# Allegro board 20250806_UNOQ.brd
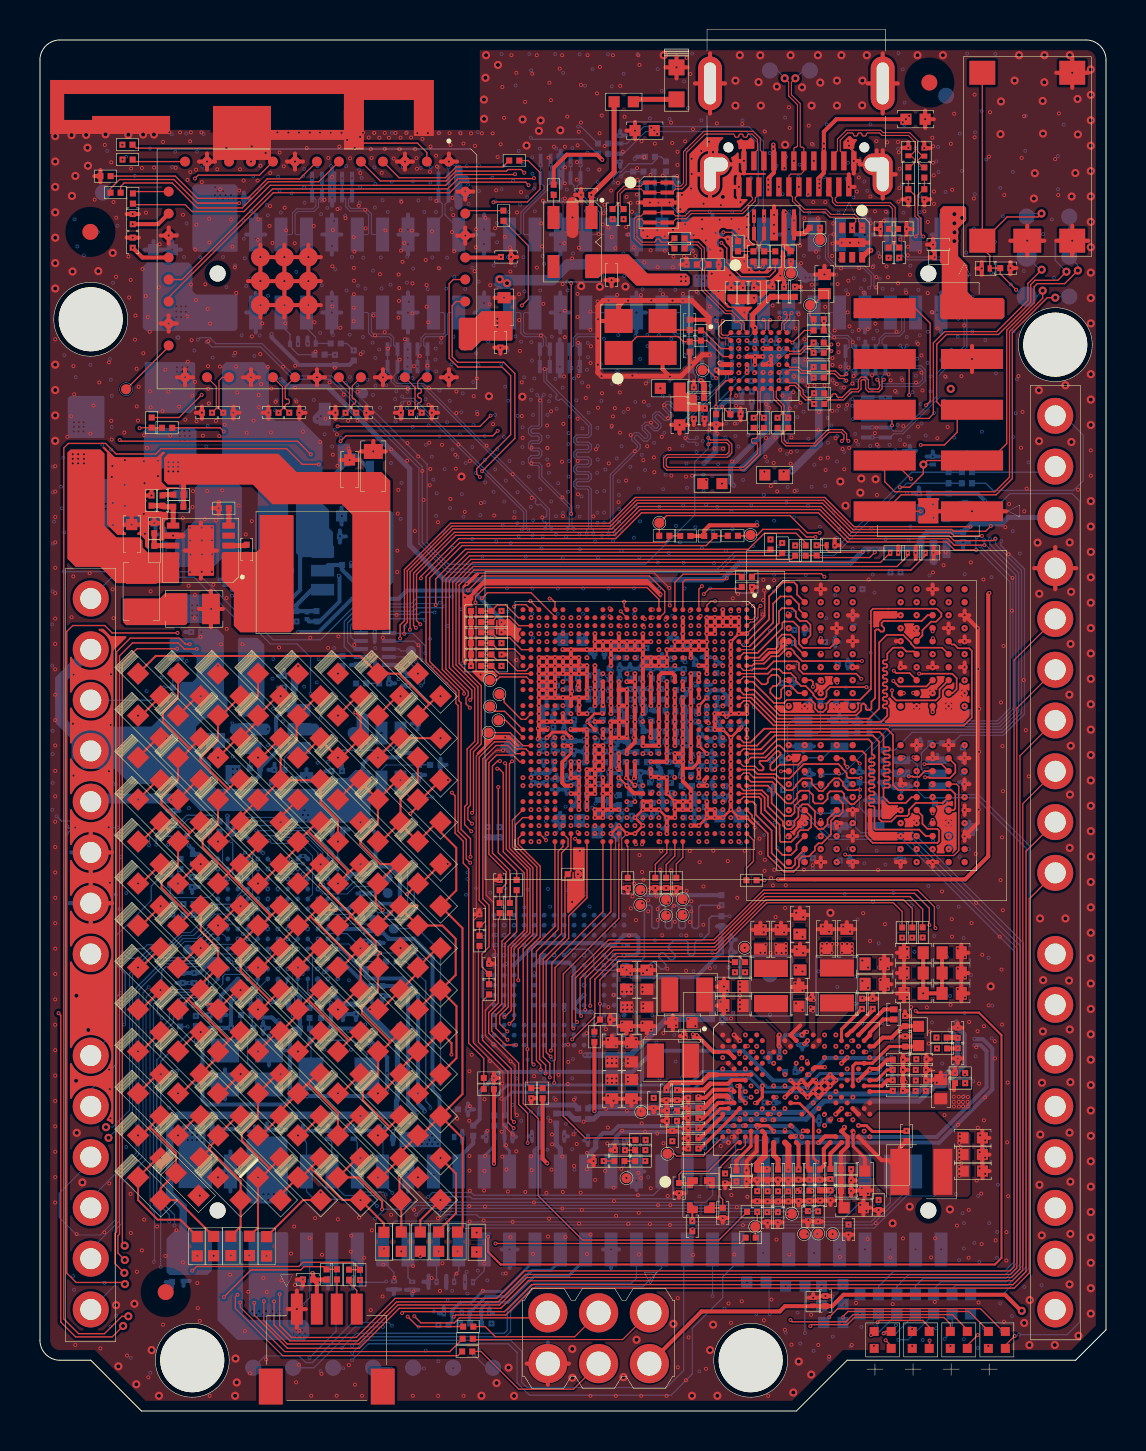
[diagram p0: board, top side]
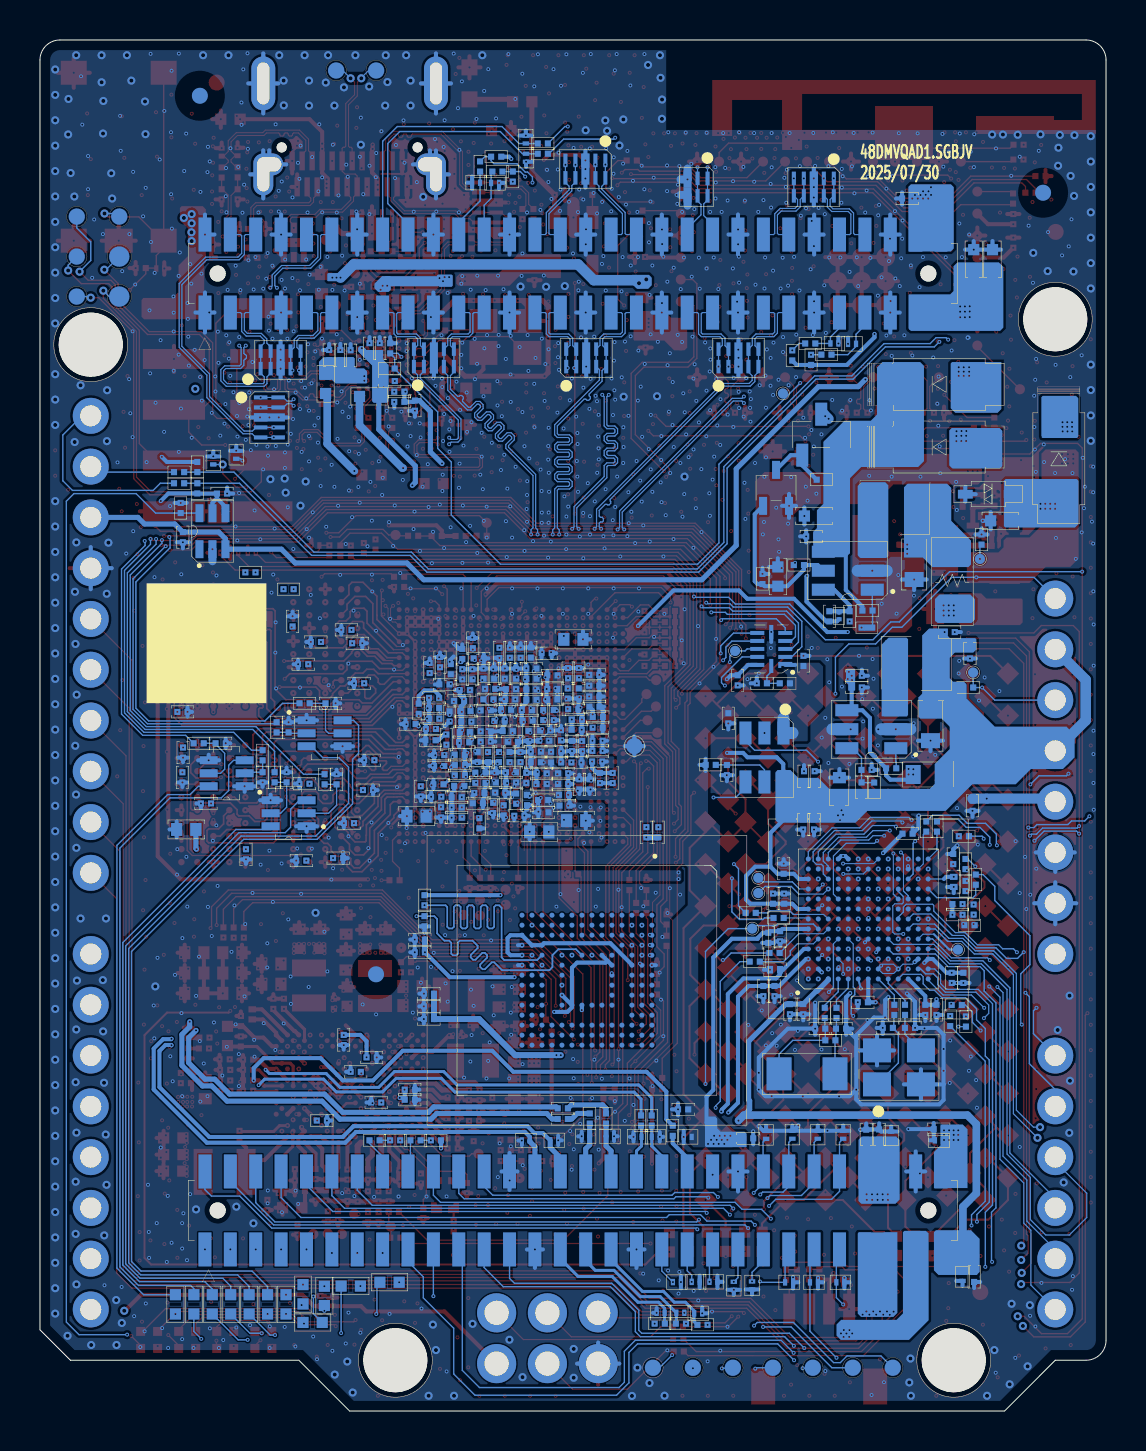
[diagram p1: board, bottom side, seen from below]

Outline 53.34 x 68.58 mm; copper layers: TOP, G2, S3, V4, V5, S6, G7, BOTTOM. Coordinates in mm from the lower left corner of the outline.
Outline path: 0,67.58 0,3.54 arc(0.29,2.83) 1,2.54 2.54,2.54 5.08,0 37.85,0 40.39,2.54 51.82,2.54 53.34,4.06 53.34,67.58 arc(53.05,68.29) 52.34,68.58 1,68.58 arc(0.29,68.29) 0,67.58

## Design rules (mm)
constraint set DEFAULT: min track width 0.066
net group DP_MUX_SSRXN1_C: nets MUX_SSRXN1_C MUX_SSRXP1_C
net group DP_MUX_SSRXN2_C: nets MUX_SSRXN2_C MUX_SSRXP2_C
net group EAR_M_R: nets EAR_M_R EAR_P_R
net group EBI0_CKE: nets EBI0_CKE_0 EBI0_CKE_1
net group EBI0_CLK: nets EBI0_CLK_M EBI0_CLK_P
net group EBI0_DQS_0: nets EBI0_DQS_0_M EBI0_DQS_0_P
net group EBI0_DQS_1: nets EBI0_DQS_1_M EBI0_DQS_1_P
net group EBI1_CKE: nets EBI1_CKE_0 EBI1_CKE_1
net group EBI1_CLK: nets EBI1_CLK_M EBI1_CLK_P
net group EBI1_DQS_0: nets EBI1_DQS_0_M EBI1_DQS_0_P
net group EBI1_DQS_1: nets EBI1_DQS_1_M EBI1_DQS_1_P
net group LINEOUT: nets LINEOUT_M LINEOUT_P
net group LINEOUT_CONN: nets LINEOUT_M_CONN LINEOUT_P_CONN
net group LINEOUT_P_C: nets LINEOUT_M_C LINEOUT_P_C
net group MG_CMD: nets WL_CMD_CLK WL_CMD_DATA
net group MIPI_DSI0_CLK_M: nets MIPI_DSI0_CLK_M MIPI_DSI0_CLK_M_CONN
net group MIPI_DSI0_CLK_P: nets MIPI_DSI0_CLK_P MIPI_DSI0_CLK_P_CONN
net group MIPI_DSI0_L0_M: nets MIPI_DSI0_L0_M MIPI_DSI0_L0_M_CONN
net group MIPI_DSI0_L0_P: nets MIPI_DSI0_L0_P MIPI_DSI0_L0_P_CONN
net group MIPI_DSI0_L1_M: nets MIPI_DSI0_L1_M MIPI_DSI0_L1_M_CONN
net group MIPI_DSI0_L1_P: nets MIPI_DSI0_L1_P MIPI_DSI0_L1_P_CONN
net group MIPI_DSI0_L3_M: nets MIPI_DSI0_L3_M MIPI_DSI0_L3_M_CONN
net group MIPI_DSI0_L3_P: nets MIPI_DSI0_L3_P MIPI_DSI0_L3_P_CONN
net group MUX_SBU1: nets MUX_SBU1 SBU1_AUXP
net group MUX_SBU2: nets MUX_SBU2 SBU2_AUXN
net group MUX_SSRXN2: nets MUX_SSRXN2 MUX_SSRXP2
net group MUX_SSRXP1: nets MUX_SSRXN1 MUX_SSRXP1
net group MUX_SSTXN1_C: nets MUX_SSTXN1 MUX_SSTXP1
net group MUX_SSTXN2: nets MUX_SSTXN2 MUX_SSTXP2
net group MUX_SSTXN2_C: nets MUX_SSTXN2_C MUX_SSTXP2_C
net group MUX_SSTXP1_C: nets MUX_SSTXN1_C MUX_SSTXP1_C
net group SDC1_CLK: nets SDC1_CLK SDC1_CLK_TR
net group VFB_S3: nets VFB_NEG_S3 VFB_S3
net group VFB_S4: nets VFB_NEG_S4 VFB_S4
net group VSNS_S1A_APC: nets VSNS_S1A_APC_M VSNS_S1A_APC_P
net group VSNS_S2A_CX: nets VSNS_S2A_CX_M VSNS_S2A_CX_P
net group CLS_CRITICAL: nets SOC_I2S_D0_R SOC_I2S_SCK SOC_I2S_SCK_R SOC_I2S_WS SOC_I2S_WS_R SOC_UART_RX_SE4 SOC_UART_TX_SE4
net group CLS_LED_MATRIX: nets LED_MATRIX_0 LED_MATRIX_0_R LED_MATRIX_1 LED_MATRIX_1_R LED_MATRIX_2 LED_MATRIX_2_R LED_MATRIX_3 LED_MATRIX_3_R LED_MATRIX_4 LED_MATRIX_4_R LED_MATRIX_5 LED_MATRIX_5_R LED_MATRIX_6 LED_MATRIX_6_R LED_MATRIX_7 LED_MATRIX_7_R LED_MATRIX_8 LED_MATRIX_8_R LED_MATRIX_9 LED_MATRIX_9_R LED_MATRIX_10 LED_MATRIX_10_R LED_MATRIX_11
net group CLS_POWER: nets AVDD1P0V AVDD1P8V AVDD3P0V DVDD1P0V DVDD1P8V VBUS_DIV8 VCOIN VCONN_IN VREF_LPDDR3 VREF_MSM_1P25V VREF_TXDAC_1P25V VREG_L3A_0P6V VREG_L4A_2P96V VREG_L5A_1P232V VREG_L6A_0P9V VREG_L7A_0P664V VREG_L8A_1P0V VREG_L9A_1P0V VREG_L10A_1P3V VREG_L11A_1P0V VREG_L12A_0P9V VREG_L13A_1P8V VREG_L14A_1P8V VREG_L16A_1P8V VREG_L17A_3P0V VREG_L18A_1P8V VREG_L19A_1P8V VREG_L21A_2P96V VREG_L22A_3P3V VREG_S1A_0P8V VREG_XO VSW_S1 VSW_S2 VSW_S3 VSW_S4
net group CLS_SINGEL-50R: nets ANT_CH0 FM_ANT LNBBCLK1 LNBBCLK2 LNBBCLK2_R MUX_XTAL_IN MUX_XTAL_OUT RFCLK2 RTC_SLEEP_CLK RTC_SLEEP_CLK_R SLEEP_CLK SM_LNBBCLK1 SWR_RX_CLK SWR_RX_CLK_R SWR_RX_DATA0 SWR_RX_DATA0_R SWR_RX_DATA1 SWR_RX_DATA1_R SWR_TX_CLK SWR_TX_CLK_R SWR_TX_DATA0 SWR_TX_DATA0_R WCN_RFCLK2 WCN_RFCLK2_R WLAN_XO_CLK
net group EBI0_CA_CS: nets EBI0_CA_0 EBI0_CA_1 EBI0_CA_2 EBI0_CA_3 EBI0_CA_4 EBI0_CA_5 EBI0_CS_0 EBI0_CS_1
net group EBI0_DQ0-7: nets EBI0_DMI_0 EBI0_DQ0 EBI0_DQ1 EBI0_DQ2 EBI0_DQ3 EBI0_DQ4 EBI0_DQ5 EBI0_DQ6 EBI0_DQ7
net group EBI0_DQ8_15: nets EBI0_DMI_1 EBI0_DQ8 EBI0_DQ9 EBI0_DQ10 EBI0_DQ11 EBI0_DQ12 EBI0_DQ13 EBI0_DQ14 EBI0_DQ15
net group EBI1_CA_CS: nets EBI1_CA_0 EBI1_CA_1 EBI1_CA_2 EBI1_CA_3 EBI1_CA_4 EBI1_CA_5 EBI1_CS_0 EBI1_CS_1
net group EBI1_DQ0_7: nets EBI1_DMI_0 EBI1_DQ0 EBI1_DQ1 EBI1_DQ2 EBI1_DQ3 EBI1_DQ4 EBI1_DQ5 EBI1_DQ6 EBI1_DQ7
net group EBI1_DQ8_15: nets EBI1_DMI_1 EBI1_DQ8 EBI1_DQ9 EBI1_DQ10 EBI1_DQ11 EBI1_DQ12 EBI1_DQ13 EBI1_DQ14 EBI1_DQ15
net group MIPI_DSI0_L2_M: nets MIPI_DSI0_L2_M
net group MIPI_DSI0_L2_P: nets MIPI_DSI0_L2_P
net group SDC1: nets SDC1_CMD SDC1_DATA_0 SDC1_DATA_1 SDC1_DATA_2 SDC1_DATA_3 SDC1_DATA_4 SDC1_DATA_5 SDC1_DATA_6 SDC1_DATA_7 SDC1_RCLK

## Placement (name value [footprint] x y rotation side)
ANT1  CLIP2P  [ANT2_1920X400]  15.71 64.83 0 top
C501  2.2UF/6.3V  [C0201_H04_T30]  42.72 19.84 0 top
C502  1UF/6.3V  [C0201_H040]  43.29 19.51 180 top
C503  1UF/6.3V  [C0201_H040]  43.29 18.49 180 top
C504  1UF/6.3V  [C0201_H040]  41.13 20.37 180 top
C505  1UF/6.3V  [C0201_H040]  42.93 17.58 90 top
C506  1UF/6.3V  [C0201_H040]  41.66 20.37 180 top
C507  680PF/25V  [C0201_H030]  42.93 17.07 90 top
C508  470PF/50V  [C0201_H030]  42.93 16.54 90 top
C509  680PF/25V  [C0201_H030]  42.93 16.02 90 top
C510  33PF/50V  [C0201_H030]  44.08 17.06 90 top
C511  33PF/50V  [C0201_H030]  44.08 16.53 90 top
C512  100NF/6.3V  [C0201_H030]  44.1 17.59 90 top
C513  100NF/6.3V  [C0201_H030]  27.18 14.61 270 bottom
C514  100NF/6.3V  [C0201_H030]  27.18 15.14 270 bottom
C601  4.7UF/10V  [C0402_H060]  40.72 10.17 90 top
C602  1UF/10V  [C0201_H030]  40.34 11.53 90 top
C603  100NF/10V  [C0201_H030]  40.34 11.01 90 top
C604  10UF/10V  [C0402_H060]  46.68 12 90 top
C605  10UF/10V  [C0402_H060]  46.67 12.83 90 top
C606  10UF/10V  [C0402_H060]  46.67 13.66 90 top
C607  10UF/6.3V  [C0402_H07_T30]  45.07 16.1 180 top
C608  4.7UF/10V  [C0402_H060]  41.27 11.52 0 top
C609  27NF/16V  [C0201_H030]  43.36 13.76 0 top
C610  4.7UF/6.3V  [C0201_H060]  40.46 9.07 0 top
C701  7PF/25V  [C0201_H030]  31.98 11.15 0 top
C702  7PF/25V  [C0201_H030]  34.16 9.91 0 top
C703  1000PF/50V  [C0201_H030]  32.64 9.25 180 top
C704  1UF/6.3V  [C0201_H040]  34.28 11.63 0 top
C705  1UF/6.3V  [C0201_H040]  35.1 11.48 90 top
C706  4.7UF/6.3V  [C0201_H060]  35.1 12.04 90 top
C707  10PF/50V  [C0201_H030]  29.02 13.05 270 top
C708  10UF/6.3V  [C0402_H07_T30]  43.71 22.92 270 top
C709  10UF/6.3V  [C0402_H07_T30]  45.62 22.92 90 top
C710  10UF/6.3V  [C0402_H07_T30]  45.62 21.91 90 top
C711  10UF/6.3V  [C0402_H07_T30]  43.71 21.91 270 top
C712  10UF/6.3V  [C0402_H07_T30]  45.62 20.89 90 top
C713  10UF/6.3V  [C0402_H07_T30]  43.71 20.89 270 top
C714  1UF/6.3V  [C0201_H040]  31.62 15.02 270 top
C715  1UF/6.3V  [C0201_H040]  31.62 14.51 270 top
C716  100NF/10V  [C0201_H030]  31.64 13.75 180 top
C717  100NF/10V  [C0201_H030]  36.4 9.69 0 top
C718  100NF/6.3V  [C0201_H030]  38.5 10.77 0 top
C719  100NF/6.3V  [C0201_H030]  30.71 15.41 0 top
C720  0  [C0201_H030]  28.99 12.5 270 top
C721  22PF/50V  [C0201_H030]  27.95 12.5 270 top
C801  1UF/6.3V  [C0201_H040]  38.14 18.56 180 bottom
C802  1UF/6.3V  [C0201_H040]  36.75 17.69 90 bottom
C803  1UF/6.3V  [C0201_H040]  34.84 15.57 90 bottom
C804  1UF/6.3V  [C0201_H040]  34.84 16.07 90 bottom
C805  1UF/6.3V  [C0201_H040]  35.89 10.74 0 top
C806  10UF/6.3V  [C0402_H07_T30]  34.7 20.28 270 top
C807  10UF/6.3V  [C0402_H07_T30]  34.7 21.23 270 top
C808  10UF/6.3V  [C0402_H07_T30]  41.76 21.35 90 top
C809  10UF/6.3V  [C0402_H07_T30]  41.76 22.36 90 top
C810  10UF/6.3V  [C0402_H07_T30]  38.02 24.33 180 top
C811  10UF/6.3V  [C0402_H07_T30]  38.03 22.54 180 top
C812  1UF/6.3V  [C0201_H040]  37.96 11.83 0 top
C813  1UF/6.3V  [C0201_H040]  32.69 14.15 270 top
C814  1UF/6.3V  [C0201_H040]  32.69 13.64 270 top
C815  2.2UF/6.3V  [C0201_H030]  32.69 14.66 270 top
C816  2.2UF/6.3V  [C0201_H030]  31.88 15.8 0 top
C817  1UF/6.3V  [C0201_H040]  32.69 15.67 270 top
C818  4.7UF/6.3V  [C0201_H060]  31.34 15.8 0 top
C819  2.2UF/6.3V  [C0201_H030]  32.69 15.16 270 top
C820  2.2UF/6.3V  [C0201_H030]  32.69 13.13 270 top
C821  2.2UF/6.3V  [C0201_H030]  37.45 10.74 0 top
C822  4.7UF/6.3V  [C0201_H060]  37.45 11.83 0 top
C823  4.7UF/6.3V  [C0201_H060]  36.4 11.83 0 top
C824  1UF/6.3V  [C0201_H040]  35.89 11.83 0 top
C825  2.2UF/6.3V  [C0201_H030]  36.93 11.83 0 top
C826  4.7UF/6.3V  [C0201_H060]  38.51 11.83 0 top
C827  1UF/6.3V  [C0201_H040]  39.55 11.85 0 top
C828  1UF/6.3V  [C0201_H040]  39.02 11.83 0 top
C829  4.7UF/6.3V  [C0201_H060]  37.96 10.76 0 top
C830  4.7UF/6.3V  [C0201_H060]  36.93 10.74 0 top
C831  4.7UF/6.3V  [C0201_H060]  39.03 10.79 0 top
C832  1UF/6.3V  [C0201_H040]  39.55 10.79 0 top
C901  1UF/10V  [C0201_H030]  36.52 15.43 270 bottom
C902  1UF/10V  [C0201_H030]  37.54 16.97 270 bottom
C1001  1UF/10V  [C0201_H030]  38.63 20.37 180 top
C1002  10UF/10V  [C0402_H060]  37.97 20.73 180 top
C1003  10UF/10V  [C0402_H060]  32.15 19.43 270 top
C1004  1UF/10V  [C0201_H030]  32.5 18.76 270 top
C1005  10UF/6.3V  [C0402_H07_T30]  29.35 19.73 0 top
C1006  10UF/6.3V  [C0402_H07_T30]  29.35 21.57 180 top
C1007  10UF/6.3V  [C0402_H07_T30]  30.37 21.57 180 top
C1008  10UF/6.3V  [C0402_H07_T30]  30.37 19.73 0 top
C1009  10UF/6.3V  [C0402_H07_T30]  29.6 17.94 180 top
C1010  10UF/6.3V  [C0402_H07_T30]  28.61 16.1 0 top
C1011  10UF/6.3V  [C0402_H07_T30]  28.61 17.94 180 top
C1012  10UF/6.3V  [C0402_H07_T30]  29.6 16.1 0 top
C1101  100NF/6.3V  [C0201_H030]  15.14 37.52 0 bottom
C1102  100NF/6.3V  [C0201_H030]  18.43 36.55 180 bottom
C1103  100NF/6.3V  [C0201_H030]  18.9 34.65 180 bottom
C1104  100NF/6.3V  [C0201_H030]  14.58 31.75 0 bottom
C1105  4.7UF/6.3V  [C0201_H060]  17.22 36.4 270 bottom
C1106  4.7UF/6.3V  [C0201_H060]  18.97 32.06 180 bottom
C1201  100NF/6.3V  [C0201_H030]  23 26.31 180 top
C1202  33PF/50V  [C0201_H030]  21.99 24.59 180 top
C1203  33PF/50V  [C0201_H030]  22.47 22.12 180 top
C1601  2.7PF/50V  [C0201_H030]  19.35 49.94 90 top
C1602  2.7PF/50V  [C0201_H030]  18.31 49.94 270 top
C1603  2.7PF/50V  [C0201_H030]  9.42 49.94 90 top
C1604  2.7PF/50V  [C0201_H030]  8.36 49.94 270 top
C1701  1UF/6.3V  [C0201_H040]  30.38 32.71 180 bottom
C1702  100NF/6.3V  [C0201_H030]  24.68 31.66 180 bottom
C1703  100NF/6.3V  [C0201_H030]  25.32 31.66 180 bottom
C1704  100NF/6.3V  [C0201_H030]  26.66 35.11 90 bottom
C1705  10UF/6.3V  [C0402_H07_T30]  26.51 29.53 90 bottom
C1706  10UF/6.3V  [C0402_H07_T30]  39.34 23.62 180 top
C1707  10UF/6.3V  [C0402_H07_T30]  28.36 28.97 270 bottom
C1708  10UF/6.3V  [C0402_H07_T30]  40.37 23.62 180 top
C1709  100NF/6.3V  [C0201_H030]  27.51 32.44 90 bottom
C1710  100NF/6.3V  [C0201_H030]  28.53 32.45 270 bottom
C1711  2.2UF/6.3V  [C0201_H030]  29.77 31.95 270 bottom
C1712  2.2UF/6.3V  [C0201_H030]  29.85 32.71 0 bottom
C1713  100NF/6.3V  [C0201_H030]  28.24 31.9 270 bottom
C1714  470NF/6.3V  [C0201_H030]  27.12 30.82 90 bottom
C1715  470NF/6.3V  [C0201_H030]  28.24 31.36 270 bottom
C1716  470NF/6.3V  [C0201_H030]  29.29 32.71 0 bottom
C1717  100NF/6.3V  [C0201_H030]  27.51 32.98 90 bottom
C1718  100NF/6.3V  [C0201_H030]  28.97 30.56 180 bottom
C1719  100NF/6.3V  [C0201_H030]  28.53 32.98 270 bottom
C1720  100NF/6.3V  [C0201_H030]  27.16 31.36 90 bottom
C1721  100NF/6.3V  [C0201_H030]  27.09 30.28 90 bottom
C1722  2.2UF/6.3V  [C0201_H030]  28.11 33.53 270 bottom
C1723  2.2UF/6.3V  [C0201_H030]  28.15 29.95 270 bottom
C1724  100NF/6.3V  [C0201_H030]  27.16 31.9 90 bottom
C1725  100NF/6.3V  [C0201_H030]  28.16 30.56 270 bottom
C1727  4.7UF/6.3V  [C0201_H060]  32.33 31.8 90 bottom
C1728  2.2UF/6.3V  [C0201_H030]  28.78 37.94 0 bottom
C1729  100NF/6.3V  [C0201_H030]  31.04 35.04 90 bottom
C1730  100NF/6.3V  [C0201_H030]  31.04 34 90 bottom
C1731  100NF/6.3V  [C0201_H030]  32.34 32.82 90 bottom
C1732  470NF/6.3V  [C0201_H030]  28.75 36.09 270 bottom
C1733  10NF/10V  [C0201_H030]  32.37 35.52 90 bottom
C1734  1UF/6.3V  [C0201_H040]  28.75 35.58 270 bottom
C1735  1UF/6.3V  [C0201_H040]  28.94 34.54 270 bottom
C1736  2.2UF/6.3V  [C0201_H030]  31.04 33.49 90 bottom
C1737  2.2UF/6.3V  [C0201_H030]  31.14 36.89 0 bottom
C1738  470NF/6.3V  [C0201_H030]  32.85 34.74 180 bottom
C1739  100NF/6.3V  [C0201_H030]  30.81 36.12 90 bottom
C1740  100NF/6.3V  [C0201_H030]  28.75 37.14 270 bottom
C1741  100NF/6.3V  [C0201_H030]  28.75 36.63 270 bottom
C1742  1UF/6.3V  [C0201_H040]  31.44 32.72 180 bottom
C1743  1UF/6.3V  [C0201_H040]  26.5 32.44 90 bottom
C1801  10UF/6.3V  [C0402_H07_T30]  34.5 29.76 270 bottom
C1802  10UF/6.3V  [C0402_H07_T30]  26.65 38.6 90 bottom
C1803  10UF/6.3V  [C0402_H07_T30]  36.04 23.59 180 top
C1804  10UF/6.3V  [C0402_H07_T30]  37.08 23.59 180 top
C1805  1UF/6.3V  [C0201_H040]  27.7 36.8 270 bottom
C1806  1UF/6.3V  [C0201_H040]  27.7 36.12 270 bottom
C1807  2.2UF/6.3V  [C0201_H030]  27.63 34.81 180 bottom
C1808  100NF/6.3V  [C0201_H030]  29.81 35.6 270 bottom
C1809  100NF/6.3V  [C0201_H030]  29.94 34.01 270 bottom
C1810  100NF/6.3V  [C0201_H030]  32.08 36.06 270 bottom
C1811  100NF/6.3V  [C0201_H030]  32.08 33.96 270 bottom
C1812  100NF/6.3V  [C0201_H030]  30.9 35.6 270 bottom
C1813  100NF/6.3V  [C0201_H030]  27.71 35.6 270 bottom
C1814  1UF/6.3V  [C0201_H040]  30.02 35.08 270 bottom
C1815  1UF/6.3V  [C0201_H040]  32.12 33.46 270 bottom
C1816  1UF/6.3V  [C0201_H040]  30.34 34.53 90 bottom
C1817  1UF/6.3V  [C0201_H040]  31.3 31.93 90 bottom
C1818  4.7UF/6.3V  [C0201_H060]  30.61 36.89 0 bottom
C1819  470NF/6.3V  [C0201_H030]  29.78 36.11 270 bottom
C1820  2.2UF/6.3V  [C0201_H030]  29.52 36.88 0 bottom
C1821  100NF/6.3V  [C0201_H030]  32.05 35.01 270 bottom
C1822  1UF/6.3V  [C0201_H040]  30.08 36.89 0 bottom
C1823  1UF/6.3V  [C0201_H040]  29.68 33.48 90 bottom
C1824  4.7UF/6.3V  [C0201_H060]  28.06 34.04 90 bottom
C1825  100NF/6.3V  [C0201_H030]  28.89 33.77 180 bottom
C1826  2.2UF/6.3V  [C0201_H030]  26.21 33.27 180 bottom
C1827  100NF/6.3V  [C0201_H030]  26.72 33.27 180 bottom
C1828  100NF/6.3V  [C0201_H030]  27.27 33.8 0 bottom
C1829  1UF/6.3V  [C0201_H040]  25.44 33.53 270 bottom
C1830  1UF/6.3V  [C0201_H040]  34.29 31 180 bottom
C1831  1UF/6.3V  [C0201_H040]  33.84 37.17 0 bottom
C1833  1UF/6.3V  [C0201_H040]  27.99 37.91 270 bottom
C1834  1UF/6.3V  [C0201_H040]  26.35 31.34 0 bottom
C1835  1UF/6.3V  [C0201_H040]  30.92 32.71 180 bottom
C1836  100NF/6.3V  [C0201_H030]  33.51 30.73 270 bottom
C1837  1UF/6.3V  [C0201_H040]  30.35 37.92 180 bottom
C1838  1UF/6.3V  [C0201_H040]  29.35 29.77 90 bottom
C1839  1UF/6.3V  [C0201_H040]  33.36 32.27 270 bottom
C1840  1UF/6.3V  [C0201_H040]  25.44 33.02 270 bottom
C1841  1UF/6.3V  [C0201_H040]  25.84 31.34 0 bottom
C1842  1UF/6.3V  [C0201_H040]  33.27 29.95 180 bottom
C1843  100NF/6.3V  [C0201_H030]  25.46 32.49 90 bottom
C1844  100NF/6.3V  [C0201_H030]  29.51 30.63 0 bottom
C1845  4.7UF/6.3V  [C0201_H060]  32.21 37.87 0 bottom
C1846  4.7UF/6.3V  [C0201_H060]  31.7 36.85 0 bottom
C1847  470NF/6.3V  [C0201_H030]  32.21 36.85 0 bottom
C1848  470NF/6.3V  [C0201_H030]  32.78 37.11 0 bottom
C1849  4.7UF/6.3V  [C0201_H060]  28.98 35.06 270 bottom
C1850  470NF/6.3V  [C0201_H030]  33.36 32.81 270 bottom
C1851  1UF/6.3V  [C0201_H040]  25.44 34.18 90 bottom
C1901  1UF/6.3V  [C0201_H040]  29.01 31.66 0 bottom
C1902  1UF/6.3V  [C0201_H040]  33.1 36.35 270 bottom
C1903  1UF/6.3V  [C0201_H040]  32.33 32.31 90 bottom
C1904  1UF/6.3V  [C0201_H040]  30.14 30.05 180 bottom
C1905  1UF/6.3V  [C0201_H040]  29.83 37.93 0 bottom
C1906  100NF/6.3V  [C0201_H030]  29.29 37.93 0 bottom
C1907  100NF/6.3V  [C0201_H030]  30.31 30.93 90 bottom
C1908  1UF/6.3V  [C0201_H040]  30.53 31.7 0 bottom
C1909  1UF/6.3V  [C0201_H040]  30.66 30.17 180 bottom
C1910  1UF/6.3V  [C0201_H040]  29.77 31.44 270 bottom
C1911  100NF/6.3V  [C0201_H030]  26.48 34.59 90 bottom
C1912  470NF/6.3V  [C0201_H030]  28.16 34.82 180 bottom
C1913  1UF/6.3V  [C0201_H040]  31.39 37.65 90 bottom
C1914  1UF/6.3V  [C0201_H040]  32.01 34.48 270 bottom
C1915  1UF/6.3V  [C0201_H040]  33.61 34.63 270 bottom
C1916  1UF/6.3V  [C0201_H040]  33.62 35.16 270 bottom
C1917  1UF/6.3V  [C0201_H040]  26.49 34.08 90 bottom
C1918  100NF/6.3V  [C0201_H030]  25.43 34.72 90 bottom
C1919  100NF/6.3V  [C0201_H030]  25.61 35.74 90 bottom
C1920  100NF/6.3V  [C0201_H030]  25.61 36.28 90 bottom
C1921  1UF/6.3V  [C0201_H040]  25.61 36.82 90 bottom
C1922  100NF/6.3V  [C0201_H030]  26.92 36.91 0 bottom
C1923  100NF/6.3V  [C0201_H030]  26.38 36.91 0 bottom
C1924  1UF/6.3V  [C0201_H040]  26.93 35.89 180 bottom
C1925  470NF/6.3V  [C0201_H030]  33.4 31.35 270 bottom
C1926  100NF/6.3V  [C0201_H030]  32.49 30.7 270 bottom
C1927  100NF/6.3V  [C0201_H030]  32.36 31.27 270 bottom
C1928  100NF/6.3V  [C0201_H030]  32.49 30.19 270 bottom
C1929  1UF/6.3V  [C0201_H040]  32.49 29.68 270 bottom
C1930  1UF/6.3V  [C0201_H040]  31.43 30.4 90 bottom
C1931  1UF/6.3V  [C0201_H040]  31.35 29.4 180 bottom
C1932  1UF/6.3V  [C0201_H040]  31.35 30.92 90 bottom
C1933  1UF/6.3V  [C0201_H040]  31.3 31.42 90 bottom
C1934  1UF/6.3V  [C0201_H040]  33.78 34.11 270 bottom
C1935  1UF/6.3V  [C0201_H040]  31.68 38.41 0 bottom
C1936  2.2UF/6.3V  [C0201_H030]  33.62 35.67 270 bottom
C1937  1UF/6.3V  [C0201_H040]  33.32 37.46 0 bottom
C1938  2.2UF/6.3V  [C0201_H030]  33.01 33.58 180 bottom
C1939  100NF/6.3V  [C0201_H030]  25.6 35.23 90 bottom
C1940  100NF/6.3V  [C0201_H030]  26.38 35.89 180 bottom
C2101  1UF/6.3V  [C0201_H040]  22.4 28.95 0 bottom
C2102  100NF/10V  [C0201_H030]  23 28.95 0 bottom
C2103  2.2UF/6.3V  [C0201_H030]  33.88 20.24 270 bottom
C2104  100NF/6.3V  [C0201_H030]  33.88 20.88 270 bottom
C2105  2.2UF/6.3V  [C0201_H030]  33.88 19.61 270 bottom
C2106  2.2UF/6.3V  [C0201_H030]  34.33 23.58 270 bottom
C2107  1UF/6.3V  [C0201_H040]  34.33 22.95 270 bottom
C2201  1UF/6.3V  [C0201_H040]  38.01 39.07 270 bottom
C2202  1UF/6.3V  [C0201_H040]  40.7 39.5 0 bottom
C2203  1UF/6.3V  [C0201_H040]  33.8 33.55 270 bottom
C2204  100NF/6.3V  [C0201_H030]  38.42 27.66 90 bottom
C2205  1UF/6.3V  [C0201_H040]  43.03 27.85 180 bottom
C2206  1UF/6.3V  [C0201_H040]  37.88 29.41 270 bottom
C2207  100NF/6.3V  [C0201_H030]  45.03 30.39 270 bottom
C2208  1UF/6.3V  [C0201_H040]  39.53 38.47 270 bottom
C2209  1UF/6.3V  [C0201_H040]  37.37 36.4 270 bottom
C2210  1UF/6.3V  [C0201_H040]  34.8 34.36 270 bottom
C2211  1UF/6.3V  [C0201_H040]  46.21 34.97 90 bottom
C2212  1UF/6.3V  [C0201_H040]  46.21 31.7 180 bottom
C2213  1UF/6.3V  [C0201_H040]  40.27 27.53 270 bottom
C2214  1UF/6.3V  [C0201_H040]  46.18 32.94 180 bottom
C2215  10UF/6.3V  [C0402_H07_T30]  46.02 29.09 270 bottom
C2216  4.7UF/6.3V  [C0201_H060]  36.86 32.55 270 bottom
C2217  100NF/6.3V  [C0201_H030]  40.11 31.38 270 bottom
C2218  1UF/6.3V  [C0201_H040]  37.47 38.41 90 bottom
C2219  1UF/6.3V  [C0201_H040]  40.17 37.36 270 bottom
C2220  1UF/6.3V  [C0201_H040]  36.93 31.06 90 bottom
C2501  2.2UF/6.3V  [C0201_H04_T30]  16.56 22.07 270 bottom
C2502  10UF/6.3V  [C0402_H07_T30]  13.34 31.2 0 bottom
C2503  100NF/6.3V  [C0201_H030]  16.59 21.01 180 bottom
C2504  100NF/6.3V  [C0201_H030]  16.1 25.63 0 bottom
C2505  100NF/6.3V  [C0201_H030]  17.14 21.01 180 bottom
C2506  100NF/6.3V  [C0201_H030]  12.17 20.45 270 bottom
C2507  100NF/6.3V  [C0201_H030]  7.43 24.82 90 bottom
C2508  100NF/6.3V  [C0201_H030]  7.43 25.36 90 bottom
C2509  100NF/6.3V  [C0201_H030]  16.13 27.13 0 bottom
C2510  100NF/6.3V  [C0201_H030]  15.11 31.75 0 bottom
C2511  100NF/6.3V  [C0201_H030]  14.61 29.34 180 bottom
C2512  100NF/6.3V  [C0201_H030]  7.65 27.61 0 bottom
C2513  100NF/6.3V  [C0201_H030]  16.66 25.63 0 bottom
C2514  4.7UF/6.3V  [C0201_H060]  9.93 28.88 90 bottom
C2515  100NF/6.3V  [C0201_H030]  16.9 23.67 180 bottom
C2516  100NF/6.3V  [C0201_H030]  16.31 23.75 180 bottom
C2517  1UF/6.3V  [C0201_H040]  7.72 21.67 180 bottom
C2518  100NF/6.3V  [C0201_H030]  7.14 21.67 180 bottom
C2519  100NF/6.3V  [C0201_H030]  15.15 29.34 180 bottom
C2520  1UF/6.3V  [C0201_H040]  9.04 20.07 180 bottom
C2521  100NF/6.3V  [C0201_H030]  8.48 20.07 180 bottom
C2522  12PF/50V  [C0201_H030]  10.92 19.16 270 bottom
C2523  12PF/50V  [C0201_H030]  9.81 19.16 90 bottom
C2524  4.7UF/6.3V  [C0201_H060]  15.82 20.1 180 bottom
C2525  2.2UF/6.3V  [C0201_H04_T30]  7.62 26.47 180 bottom
C2526  100NF/6.3V  [C0201_H030]  15.15 20.1 180 bottom
C2527  7PF/25V  [C0201_H030]  13.26 19.13 90 bottom
C2528  7PF/25V  [C0201_H030]  14.3 19.13 270 bottom
C2529  100NF/6.3V  [C0201_H030]  44.23 45.89 90 bottom
C2601  220NF/10V  [C0201_H030]  42.99 57.94 0 top
C2602  220NF/10V  [C0201_H030]  42.46 57.94 0 top
C2603  220NF/10V  [C0201_H030]  28.65 59.87 0 top
C2604  220NF/10V  [C0201_H030]  29.2 59.87 0 top
C2605  100NF/6.3V  [C0201_H030]  48.3 57.17 90 top
C2607  10UF/10V  [C0402_H060]  43.81 64.62 90 top
C2608  10UF/10V  [C0402_H060]  30.26 64.05 270 top
C2609  100NF/6.3V  [C0201_H030]  44.94 58.35 270 top
C2610  100NF/6.3V  [C0201_H030]  13.41 6.58 270 top
C2611  100NF/10V  [C0201_H030]  39.3 5.5 180 top
C2614  100NF/6.3V  [C0201_H030]  46.19 43.71 180 bottom
C2615  100NF/6.3V  [C0201_H030]  7.82 38.96 90 bottom
C2616  100NF/6.3V  [C0201_H030]  6.81 37.9 180 bottom
C2617  100NF/10V  [C0201_H030]  6.68 30.28 180 bottom
C2618  0.1UF/50V  [C0402_H060]  5.68 57.61 0 bottom
C2619  0.1UF/50V  [C0402_H060]  6.62 57.61 0 bottom
C2620  100NF/6.3V  [C0201_H030]  9.95 60.65 270 bottom
C2621  100NF/10V  [C0201_H030]  11.35 13.83 0 bottom
C2622  100NF/10V  [C0201_H030]  12 13.82 0 bottom
C2623  100NF/6.3V  [C0201_H030]  21.16 15.09 270 bottom
C2624  100NF/6.3V  [C0201_H030]  17.91 13.64 90 bottom
C2625  100NF/6.3V  [C0201_H030]  6.6 6.71 180 bottom
C2626  100NF/6.3V  [C0201_H030]  8.37 14.1 270 bottom
C2627  330NF/6.3V  [C0201_H030]  32 58.66 270 top
C2628  330NF/6.3V  [C0201_H030]  32 58.15 270 top
C2629  330NF/6.3V  [C0201_H030]  44.25 61.95 0 top
C2630  330NF/6.3V  [C0201_H030]  43.45 61.96 0 top
C2631  0.1UF/50V  [C0402_H060]  5.29 44.53 270 bottom
C2632  220PF/25V  [C0201_H030]  45.92 17.89 0 top
C2633  220PF/25V  [C0201_H030]  45.92 18.92 180 top
C2701  100NF/10V  [C0201_H030]  42.2 31.7 180 bottom
C2702  100NF/10V  [C0201_H030]  44.3 33.4 90 bottom
C2703  100NF/10V  [C0201_H030]  40.9 34.2 0 bottom
C2704  100NF/10V  [C0201_H030]  38.8 35.4 90 bottom
C2705  100NF/10V  [C0201_H030]  38.5 31.6 0 bottom
C2706  100NF/10V  [C0201_H030]  41 31.7 0 bottom
C2801  4.7UF/10V  [C0402_H060]  14.61 44.77 270 bottom
C2802  100NF/10V  [C0201_H030]  14.75 43.75 270 bottom
C2803  120PF/25V  [C0201_H030]  13.84 39.75 0 bottom
C2804  22UF/6.3V  [C0603_H100]  9.6 42.34 180 bottom
C2805  4.7UF/6.3V  [C0201_H060]  12.47 36.78 90 bottom
C2806  100NF/6.3V  [C0201_H030]  12.47 36.2 90 bottom
C2807  120PF/25V  [C0201_H030]  12.23 31.19 0 bottom
C2808  4.7UF/10V  [C0402_H060]  16.42 41.74 0 bottom
C2809  22UF/6.3V  [C0603_H100]  8.78 34.28 180 bottom
C2810  22UF/25V  [C0805_H150]  5.07 40.99 0 top
C2811  22UF/25V  [C0805_H150]  7.72 40.12 90 top
C2812  0.1UF/50V  [C0402_H060]  4.59 43.86 180 top
C2813  100NF/16V  [C0201_H030]  10.34 43.08 180 top
C2814  22PF/50V  [C0201_H030]  6.13 45.54 0 top
C2815  22UF/10V  [C0603_H090]  16.68 47.25 180 top
C2816  10UF/10V  [C0402_H060]  15.49 47.09 180 top
C2901  4.7UF/6.3V  [C0201_H060]  4.64 59.62 180 top
C2907  4.7UF/6.3V  [C0201_H060]  23.32 57.73 90 top
C2909  4.7UF/6.3V  [C0201_H060]  4.64 58.44 180 top
C2911  10UF/6.3V  [C0402_H07_T30]  23.22 55.21 180 top
C2912  4.7UF/6.3V  [C0201_H060]  23.04 53.45 0 top
C2921  2.7PF/50V  [C0201_H030]  15.04 49.94 270 top
C2922  2.7PF/50V  [C0201_H030]  16.08 49.94 90 top
C2923  2.7PF/50V  [C0201_H030]  12.73 49.94 90 top
C2924  2.7PF/50V  [C0201_H030]  11.68 49.94 270 top
C3001  1UF/6.3V  [C0201_H040]  34.59 55.94 180 top
C3002  100NF/6.3V  [C0201_H030]  35.17 55.93 180 top
C3003  1000PF/50V  [C0201_H030]  35.73 55.94 180 top
C3004  1UF/6.3V  [C0201_H040]  38.31 52.82 0 bottom
C3005  100NF/6.3V  [C0201_H030]  38.87 52.82 0 bottom
C3006  1000PF/50V  [C0201_H030]  37.8 52.81 0 bottom
C3007  1UF/6.3V  [C0201_H040]  34.58 50.29 180 bottom
C3008  100NF/6.3V  [C0201_H030]  35.36 50.48 270 bottom
C3009  1000PF/50V  [C0201_H030]  35.36 50.99 270 bottom
C3010  1UF/6.3V  [C0201_H040]  37.77 55.98 180 top
C3011  100NF/6.3V  [C0201_H030]  37.23 55.98 180 top
C3012  1000PF/50V  [C0201_H030]  36.65 55.99 180 top
C3013  1UF/6.3V  [C0201_H040]  36.34 53.16 0 bottom
C3014  100NF/6.3V  [C0201_H030]  35.84 51.52 90 bottom
C3015  1000PF/50V  [C0201_H030]  36.85 53.16 0 bottom
C3016  10UF/10V  [C0402_H060]  32 49.81 0 top
C3017  100NF/10V  [C0201_H030]  33.25 49.89 0 top
C3018  1000PF/50V  [C0201_H030]  32.72 49.89 0 top
C3019  100NF/10V  [C0201_H030]  35.7 57.76 180 top
C3020  100NF/10V  [C0201_H030]  36.24 57.76 180 top
C3021  36PF/50V  [C0201_H030]  32.51 53.24 0 top
C3022  36PF/50V  [C0201_H030]  32.51 54.33 180 top
C3025  1UF/6.3V  [C0201_H040]  27.33 60.83 270 top
C3026  1UF/6.3V  [C0201_H040]  28.6 56.82 0 top
C3027  10UF/6.3V  [C0402_H07_T30]  39.25 56.37 180 top
C3028  100NF/6.3V  [C0201_H030]  35.82 53.16 0 bottom
D2801  SX34  [SMA_H240]  8.35 51.36 270 bottom
D2802  SX34  [SMA_H240]  2.36 47.63 0 bottom
D2803  SX34  [SMA_H240]  8.35 48.22 270 bottom
D26001  DF2B7ASL  [D_06X03_H030_TOSHIBA]  44.67 47.55 180 bottom
D26002  DF2B7ASL  [D_06X03_H030_TOSHIBA]  43.52 47.83 180 bottom
D26003  DF2B7ASL  [D_06X03_H030_TOSHIBA]  44.97 57.71 90 top
D26005  DF2B7ASL  [D_06X03_H030_TOSHIBA]  44.51 42.93 270 top
D26006  DF2B7ASL  [D_06X03_H030_TOSHIBA]  43.62 42.93 270 top
D26007  DF2B7ASL  [D_06X03_H030_TOSHIBA]  42.74 42.93 270 top
D26008  DF2B7ASL  [D_06X03_H030_TOSHIBA]  39.56 43.3 270 top
D26009  DF2B7ASL  [D_06X03_H030_TOSHIBA]  47.32 57.15 90 top
D26017  DF2B7ASL  [D_06X03_H030_TOSHIBA]  38.69 5.47 0 top
D26046  DF2B7ASL  [D_06X03_H030_TOSHIBA]  29.03 63.6 180 bottom
D26047  DF2B7ASL  [D_06X03_H030_TOSHIBA]  29.02 62.69 0 bottom
D26048  DF2B7ASL  [D_06X03_H030_TOSHIBA]  31.52 61.44 90 bottom
D26049  DF2B7ASL  [D_06X03_H030_TOSHIBA]  30.57 61.43 270 bottom
D26050  DF2B7ASL  [D_06X03_H030_TOSHIBA]  12.71 53.38 90 bottom
D26051  DF2B7ASL  [D_06X03_H030_TOSHIBA]  13.59 53.4 270 bottom
D26063  DF2B7ASL  [D_06X03_H030_TOSHIBA]  29.03 13.53 90 bottom
D26064  DF2B7ASL  [D_06X03_H030_TOSHIBA]  27.61 13.54 270 bottom
D26065  DF2B7ASL  [D_06X03_H030_TOSHIBA]  22.29 4.91 90 bottom
D26066  DF2B7ASL  [D_06X03_H030_TOSHIBA]  21.3 4.91 270 bottom
D26067  DF2B7ASL  [D_06X03_H030_TOSHIBA]  20.41 4.89 270 bottom
D26069  DF2B7ASL  [D_06X03_H030_TOSHIBA]  21.47 6.45 270 bottom
D26070  DF2B7ASL  [D_06X03_H030_TOSHIBA]  20.53 6.46 270 bottom
D26071  DF2B7ASL  [D_06X03_H030_TOSHIBA]  19.64 6.46 270 bottom
D26072  DF2B7ASL  [D_06X03_H030_TOSHIBA]  18.62 6.26 0 bottom
D26073  DF2B7ASL  [D_06X03_H030_TOSHIBA]  17.71 6.28 0 bottom
D26074  DF2B7ASL  [D_06X03_H030_TOSHIBA]  15.86 6.44 270 bottom
D26075  DF2B7ASL  [D_06X03_H030_TOSHIBA]  14.61 6.44 270 bottom
D26076  DF2B7ASL  [D_06X03_H030_TOSHIBA]  13.29 6.44 270 bottom
D26087  DF2B7ASL  [D_06X03_H030_TOSHIBA]  26.04 13.74 90 bottom
D26088  DF2B7ASL  [D_06X03_H030_TOSHIBA]  24.82 13.74 270 bottom
D26089  DF2B7ASL  [D_06X03_H030_TOSHIBA]  23.44 13.72 90 bottom
D26090  DF2B7ASL  [D_06X03_H030_TOSHIBA]  22.53 13.72 270 bottom
D26091  DF2B7ASL  [D_06X03_H030_TOSHIBA]  17.01 13.81 180 bottom
D26092  DF2B7ASL  [D_06X03_H030_TOSHIBA]  15.7 13.82 180 bottom
D26093  DF2B7ASL  [D_06X03_H030_TOSHIBA]  14.42 13.82 180 bottom
D26094  DF2B7ASL  [D_06X03_H030_TOSHIBA]  13.15 13.82 180 bottom
D26097  DF2B7ASL  [D_06X03_H030_TOSHIBA]  10.75 13.78 180 bottom
D26099  DF2B7ASL  [D_06X03_H030_TOSHIBA]  20.93 13.71 90 bottom
D26100  DF2B7ASL  [D_06X03_H030_TOSHIBA]  7.18 6.71 0 bottom
D26101  DF2B7ASL  [D_06X03_H030_TOSHIBA]  8.36 13.54 90 bottom
D26102  TVW060305VB1SCA1  [D_06X03_H04_INPAQ]  44.25 62.97 180 top
D26103  TVW060305VB1SCA1  [D_06X03_H04_INPAQ]  43.45 62.99 180 top
D26104  TVW060305VB1SCA1  [D_06X03_H04_INPAQ]  43.16 59.13 90 top
D26105  TVW060305VB1SCA1  [D_06X03_H04_INPAQ]  42.26 59.13 270 top
D26201  PJGBLC24C  [SOD323FL_H090_UM]  5.89 45.86 90 bottom
D27001  BLU_LED  [LED0603_H050]  19.47 36.32 225 top
D27002  BLU_LED  [LED0603_H050]  19.47 34.22 225 top
D27003  BLU_LED  [LED0603_H050]  19.47 32.12 225 top
D27004  BLU_LED  [LED0603_H050]  19.47 30.02 225 top
D27005  BLU_LED  [LED0603_H050]  19.47 27.92 225 top
D27006  BLU_LED  [LED0603_H050]  19.47 25.82 225 top
D27007  BLU_LED  [LED0603_H050]  19.47 23.72 225 top
D27008  BLU_LED  [LED0603_H050]  19.47 21.62 225 top
D27009  BLU_LED  [LED0603_H050]  19.47 19.52 225 top
D27010  BLU_LED  [LED0603_H050]  19.47 17.42 225 top
D27011  BLU_LED  [LED0603_H050]  19.47 15.32 225 top
D27012  BLU_LED  [LED0603_H050]  19.47 13.22 225 top
D27013  BLU_LED  [LED0603_H050]  19.47 11.12 225 top
D27014  BLU_LED  [LED0603_H050]  17.47 36.32 225 top
D27015  BLU_LED  [LED0603_H050]  17.47 34.22 225 top
D27016  BLU_LED  [LED0603_H050]  17.47 32.12 225 top
D27017  BLU_LED  [LED0603_H050]  17.47 30.02 225 top
D27018  BLU_LED  [LED0603_H050]  17.47 27.92 225 top
D27019  BLU_LED  [LED0603_H050]  17.47 25.82 225 top
D27020  BLU_LED  [LED0603_H050]  17.47 23.72 225 top
D27021  BLU_LED  [LED0603_H050]  17.47 21.62 225 top
D27022  BLU_LED  [LED0603_H050]  17.47 19.52 225 top
D27023  BLU_LED  [LED0603_H050]  17.47 17.42 225 top
D27024  BLU_LED  [LED0603_H050]  17.47 15.32 225 top
D27025  BLU_LED  [LED0603_H050]  17.47 13.22 225 top
D27026  BLU_LED  [LED0603_H050]  17.47 11.12 225 top
D27027  BLU_LED  [LED0603_H050]  15.47 36.32 225 top
D27028  BLU_LED  [LED0603_H050]  15.47 34.22 225 top
D27029  BLU_LED  [LED0603_H050]  15.47 32.12 225 top
D27030  BLU_LED  [LED0603_H050]  15.47 30.02 225 top
D27031  BLU_LED  [LED0603_H050]  15.47 27.92 225 top
D27032  BLU_LED  [LED0603_H050]  15.47 25.82 225 top
D27033  BLU_LED  [LED0603_H050]  15.47 23.72 225 top
D27034  BLU_LED  [LED0603_H050]  15.47 21.62 225 top
D27035  BLU_LED  [LED0603_H050]  15.47 19.52 225 top
D27036  BLU_LED  [LED0603_H050]  15.47 17.42 225 top
D27037  BLU_LED  [LED0603_H050]  15.47 15.32 225 top
D27038  BLU_LED  [LED0603_H050]  15.47 13.22 225 top
D27039  BLU_LED  [LED0603_H050]  15.47 11.12 225 top
D27040  BLU_LED  [LED0603_H050]  13.47 36.32 225 top
D27041  BLU_LED  [LED0603_H050]  13.47 34.22 225 top
D27042  BLU_LED  [LED0603_H050]  13.47 32.12 225 top
D27043  BLU_LED  [LED0603_H050]  13.47 30.02 225 top
D27044  BLU_LED  [LED0603_H050]  13.47 27.92 225 top
D27045  BLU_LED  [LED0603_H050]  13.47 25.82 225 top
D27046  BLU_LED  [LED0603_H050]  13.47 23.72 225 top
D27047  BLU_LED  [LED0603_H050]  13.47 21.62 225 top
D27048  BLU_LED  [LED0603_H050]  13.47 19.52 225 top
D27049  BLU_LED  [LED0603_H050]  13.47 17.42 225 top
D27050  BLU_LED  [LED0603_H050]  13.47 15.32 225 top
D27051  BLU_LED  [LED0603_H050]  13.47 13.22 225 top
D27052  BLU_LED  [LED0603_H050]  13.47 11.12 225 top
D27053  BLU_LED  [LED0603_H050]  11.47 36.32 225 top
D27054  BLU_LED  [LED0603_H050]  11.47 34.22 225 top
D27055  BLU_LED  [LED0603_H050]  11.47 32.12 225 top
D27056  BLU_LED  [LED0603_H050]  11.47 30.02 225 top
D27057  BLU_LED  [LED0603_H050]  11.47 27.92 225 top
D27058  BLU_LED  [LED0603_H050]  11.47 25.82 225 top
D27059  BLU_LED  [LED0603_H050]  11.47 23.72 225 top
D27060  BLU_LED  [LED0603_H050]  11.47 21.62 225 top
D27061  BLU_LED  [LED0603_H050]  11.47 19.52 225 top
D27062  BLU_LED  [LED0603_H050]  11.47 17.42 225 top
D27063  BLU_LED  [LED0603_H050]  11.47 15.32 225 top
D27064  BLU_LED  [LED0603_H050]  11.47 13.22 225 top
D27065  BLU_LED  [LED0603_H050]  11.47 11.12 225 top
D27066  BLU_LED  [LED0603_H050]  9.47 36.32 225 top
D27067  BLU_LED  [LED0603_H050]  9.47 34.22 225 top
D27068  BLU_LED  [LED0603_H050]  9.47 32.12 225 top
D27069  BLU_LED  [LED0603_H050]  9.47 30.02 225 top
D27070  BLU_LED  [LED0603_H050]  9.47 27.92 225 top
D27071  BLU_LED  [LED0603_H050]  9.47 25.82 225 top
D27072  BLU_LED  [LED0603_H050]  9.47 23.72 225 top
D27073  BLU_LED  [LED0603_H050]  9.47 21.62 225 top
D27074  BLU_LED  [LED0603_H050]  9.47 19.52 225 top
D27075  BLU_LED  [LED0603_H050]  9.47 17.42 225 top
D27076  BLU_LED  [LED0603_H050]  9.47 15.32 225 top
D27077  BLU_LED  [LED0603_H050]  9.47 13.22 225 top
D27078  BLU_LED  [LED0603_H050]  9.47 11.12 225 top
D27079  BLU_LED  [LED0603_H050]  7.47 36.32 225 top
D27080  BLU_LED  [LED0603_H050]  7.47 34.22 225 top
D27081  BLU_LED  [LED0603_H050]  7.47 32.12 225 top
D27082  BLU_LED  [LED0603_H050]  7.47 30.02 225 top
D27083  BLU_LED  [LED0603_H050]  7.47 27.92 225 top
D27084  BLU_LED  [LED0603_H050]  7.47 25.82 225 top
D27085  BLU_LED  [LED0603_H050]  7.47 23.72 225 top
D27086  BLU_LED  [LED0603_H050]  7.47 21.62 225 top
D27087  BLU_LED  [LED0603_H050]  7.47 19.52 225 top
D27088  BLU_LED  [LED0603_H050]  7.47 17.42 225 top
D27089  BLU_LED  [LED0603_H050]  7.47 15.32 225 top
D27090  BLU_LED  [LED0603_H050]  7.47 13.22 225 top
D27091  BLU_LED  [LED0603_H050]  7.37 11.34 225 top
D27092  BLU_LED  [LED0603_H050]  5.47 36.32 225 top
D27093  BLU_LED  [LED0603_H050]  5.47 34.22 225 top
D27094  BLU_LED  [LED0603_H050]  5.47 32.12 225 top
D27095  BLU_LED  [LED0603_H050]  5.47 30.02 225 top
D27096  BLU_LED  [LED0603_H050]  5.47 27.92 225 top
D27097  BLU_LED  [LED0603_H050]  5.47 25.82 225 top
D27098  BLU_LED  [LED0603_H050]  5.47 23.72 225 top
D27099  BLU_LED  [LED0603_H050]  5.47 21.62 225 top
D27100  BLU_LED  [LED0603_H050]  5.47 19.52 225 top
D27101  BLU_LED  [LED0603_H050]  5.47 17.42 225 top
D27102  BLU_LED  [LED0603_H050]  5.47 15.32 225 top
D27103  BLU_LED  [LED0603_H050]  5.47 13.22 225 top
D27104  BLU_LED  [LED0603_H050]  5.47 11.12 225 top
D27201  GRN_LED  [LED0603_H090]  31.85 66.41 180 top
D27301  RED_BLU_GRN_LED4P  [LED4_10X10_A1_H04]  44.07 3.56 270 top
D27302  RED_BLU_GRN_LED4P  [LED4_10X10_A1_H04]  42.16 3.56 270 top
D27401  RED_BLU_GRN_LED4P  [LED4_10X10_A1_H04]  45.97 3.56 270 top
D27402  RED_BLU_GRN_LED4P  [LED4_10X10_A1_H04]  47.88 3.56 270 top
DRAM1  MT53E512M32D1ZW-046_WT_B  [BGA200P_145X100_H110]  41.86 34.28 180 top
EMMC1  EMMC16G-MW28-GA01_BGA153P  [BGA153P_130X115_05_H090]  25.97 21.55 90 bottom
F501  BEAD_120  [BEAD0402_H060]  43.96 18.76 0 top
JANALOG1  20TW-995  [HEAD14_387X25_2D54_H87_F]  2.54 40.64 270 top
JBTN1  TS-A57AHNP-2-W-S085  [SW5_85X64_H34_P12]  49.4 62.74 270 top
JCTL1  P302V-2X5-ST2-RT  [HEAD2X5P_127X62_254_H970_M]  44.45 50.08 0 top
JDIGITAL1  20TW-994  [HEAD18_477X25_2D54_H87_F]  50.8 5.08 90 top
JMEDIA1  SM2554V6-2X30-SMT-G5-1-RT  [HEAD2X30_385X50_1D27_H48_F_R_P]  26.67 56.9 270 bottom
JMISC1  SM2554V6-2X30-SMT-G5-1-RT  [HEAD2X30_385X50_1D27_H48_F_R_P]  26.67 10.03 270 bottom
JSPI1  HD2X03C-R3H-HH  [HEAD2X3_76X50_2D54_H87_M_PIP]  30.49 4.91 180 top
JUSB1  USB3-24CSW-R9H-H  [USB2X12_89X81_H35]  37.85 65.06 270 top
L601  1UH/4.2A  [L_25X20_H10_D]  44.1 11.96 90 top
L1001  470NH/4.7A  [CHOKE_200X160_H100_A]  39.88 21.29 180 top
L1002  470NH/4.7A  [CHOKE_200X160_H100_A]  36.58 21.26 180 top
L1003  470NH/4.7A  [CHOKE_200X160_H100_A]  32.38 20.83 270 top
L1004  470NH/4.7A  [CHOKE_200X160_H100_A]  31.67 17.53 270 top
L2801  1UH/4.2A  [L_25X20_H10_D]  10.56 45.18 90 bottom
L2802  1UH/4.2A  [L_25X20_H10_D]  9.5 37.39 90 bottom
L2803  3.3UH/4.3A  [CHOKE_60X59_H45_INPAQ]  14.16 41.93 90 top
MCU1  STM32U585AII6TR_BGA169P  [BGA169_70_0D5_H06]  11.9 24.61 270 bottom
NOREF  -  []  44.89 57.82 90 top
NOREF#2  -  []  41.28 4.84 90 top
NOREF#3  -  []  46.34 44.01 0 top
NOREF#4  -  []  25.31 36.13 90 top
NOREF#5  -  []  35.88 55.64 0 top
NOREF#6  -  []  47.43 4.01 0 top
NOREF#7  -  []  30.67 62.44 90 top
NOREF#8  -  []  29.14 32.41 0 top
NOREF#9  -  []  18.75 5.94 90 top
NOREF#10  -  []  28.45 35.73 0 top
NOREF#11  -  []  41.87 62.36 0 top
NOREF#12  -  []  21.67 37.57 0 top
NOREF#13  -  []  28.46 30.71 90 top
NOREF#14  -  []  10.62 13.59 90 top
NOREF#15  -  []  17.3 20.71 90 top
NOREF#16  -  []  7.05 50.52 0 top
NOREF#17  -  []  49.55 3.56 0 top
NOREF#18  -  []  29.36 30.93 90 top
NOREF#19  -  []  10.91 13.47 90 top
NOREF#20  -  []  38.72 52.52 90 top
NOREF#21  -  []  24.87 14.93 0 top
NOREF#22  -  []  38.22 20.23 0 top
NOREF#23  -  []  33.1 31.5 0 top
NOREF#24  -  []  9.11 18.79 0 top
NOREF#25  -  []  40.47 37.51 90 top
NOREF#26  -  []  16.89 14.12 0 top
NOREF#27  -  []  38.35 11.07 0 top
NOREF#28  -  []  42.62 5.84 0 top
NOREF#29  -  []  45.89 17.21 0 top
NOREF#30  -  []  40 33.25 90 top
NOREF#31  -  []  17.85 31.66 0 top
NOREF#32  -  []  19.05 34.35 90 top
NOREF#33  -  []  36.4 43.64 0 top
NOREF#34  -  []  19.33 6.3 90 top
NOREF#35  -  []  17.43 22.78 0 top
NOREF#36  -  []  31.39 43.48 90 top
NOREF#37  -  []  12.59 53.19 90 top
NOREF#38  -  []  46.15 45.47 0 top
NOREF#39  -  []  31.82 33.61 0 top
NOREF#40  -  []  34.16 13.43 90 top
NOREF#41  -  []  42.2 4.84 90 top
NOREF#42  -  []  22.85 28.65 0 top
NOREF#43  -  []  28 36.95 90 top
NOREF#44  -  []  37.17 38.26 90 top
NOREF#45  -  []  36.39 57.45 0 top
NOREF#46  -  []  40.55 39.2 0 top
NOREF#47  -  []  33.64 43.47 90 top
NOREF#48  -  []  34.73 50.59 90 top
NOREF#49  -  []  11.56 64.08 90 top
NOREF#50  -  []  32.31 34.63 90 top
NOREF#51  -  []  21.16 6.33 0 top
NOREF#52  -  []  32.79 30.85 90 top
NOREF#53  -  []  32.66 31.42 90 top
NOREF#54  -  []  22.72 24.8 90 top
NOREF#55  -  []  26.79 33.93 0 top
NOREF#56  -  []  8.9 21.61 90 top
NOREF#57  -  []  24.51 13.58 90 top
NOREF#58  -  []  16.29 31.24 90 top
NOREF#59  -  []  39.11 51.92 90 top
NOREF#60  -  []  33.7 31.5 90 top
NOREF#61  -  []  14.99 37.82 90 top
NOREF#62  -  []  33.58 19.76 0 top
NOREF#63  -  []  43.23 16.92 90 top
NOREF#64  -  []  26.88 15.29 0 top
NOREF#65  -  []  5.43 58.11 90 top
NOREF#66  -  []  29.05 29.62 90 top
NOREF#67  -  []  38.95 31.9 0 top
NOREF#68  -  []  8.63 19.77 90 top
NOREF#69  -  []  31.19 16.1 0 top
NOREF#70  -  []  24.69 13.55 90 top
NOREF#71  -  []  44.4 60.56 90 top
NOREF#72  -  []  31.6 31.78 0 top
NOREF#73  -  []  13.6 50.29 0 top
NOREF#74  -  []  3.63 61.24 0 top
NOREF#75  -  []  14.99 37.22 0 top
NOREF#76  -  []  33.1 49.59 90 top
NOREF#77  -  []  38.31 39.22 90 top
NOREF#78  -  []  10.03 64.55 90 top
NOREF#79  -  []  32.06 38.17 90 top
NOREF#80  -  []  21.98 4.75 0 top
NOREF#81  -  []  46.45 44.87 90 top
NOREF#82  -  []  7.73 24.67 0 top
NOREF#83  -  []  13.92 20.21 0 top
NOREF#84  -  []  19.05 34.95 0 top
NOREF#85  -  []  15.46 46.35 0 top
NOREF#86  -  []  17.3 21.31 0 top
NOREF#87  -  []  37.97 50.54 0 top
NOREF#88  -  []  28.45 36.78 0 top
NOREF#89  -  []  11.2 14.13 90 top
NOREF#90  -  []  12.43 49.79 0 top
NOREF#91  -  []  25.25 59.63 0 top
NOREF#92  -  []  43.57 62.81 90 top
NOREF#93  -  []  12.4 53.22 0 top
NOREF#94  -  []  30.26 61.27 90 top
NOREF#95  -  []  28.31 34.52 90 top
NOREF#96  -  []  13.28 53.56 0 top
NOREF#97  -  []  41.28 20.07 0 top
NOREF#98  -  []  28.45 57.12 0 top
NOREF#99  -  []  41.45 32 0 top
NOREF#100  -  []  27.21 32.83 90 top
NOREF#101  -  []  46.53 46.11 90 top
NOREF#102  -  []  21.97 38.65 90 top
NOREF#103  -  []  43.4 48.14 0 top
NOREF#104  -  []  6.21 49.48 0 top
NOREF#105  -  []  38.27 23.83 0 top
NOREF#106  -  []  17.08 46.45 0 top
NOREF#107  -  []  29.72 35.23 0 top
NOREF#108  -  []  25.3 35.08 90 top
NOREF#109  -  []  21.67 39.76 0 top
NOREF#110  -  []  38.88 10.49 90 top
NOREF#111  -  []  6.83 30.58 0 top
NOREF#112  -  []  43.1 13.21 0 top
NOREF#113  -  []  42.05 32.98 0 top
NOREF#114  -  []  39.01 42.75 90 top
NOREF#115  -  []  35.2 20.53 0 top
NOREF#116  -  []  34.57 53.94 0 top
NOREF#117  -  []  20.28 4.69 90 top
NOREF#118  -  []  46.12 21.66 90 top
NOREF#119  -  []  22.69 40.32 0 top
NOREF#120  -  []  17.34 41.32 90 top
NOREF#121  -  []  13.05 49.05 0 top
NOREF#122  -  []  11.61 16.59 90 top
NOREF#123  -  []  25.91 36.67 0 top
NOREF#124  -  []  40.19 12.4 0 top
NOREF#125  -  []  33.4 36.5 90 top
NOREF#126  -  []  34.25 25.25 90 top
NOREF#127  -  []  15.97 20.4 0 top
NOREF#128  -  []  7.95 19.21 90 top
NOREF#129  -  []  41.25 63.21 0 top
NOREF#130  -  []  36.29 24.09 90 top
NOREF#131  -  []  43.23 15.87 90 top
NOREF#132  -  []  29.05 35.73 90 top
NOREF#133  -  []  38.81 54.35 0 top
NOREF#134  -  []  30.26 61.59 0 top
NOREF#135  -  []  17.61 13.49 90 top
NOREF#136  -  []  7.02 6.4 0 top
NOREF#137  -  []  28.96 65.99 0 top
NOREF#138  -  []  28.63 38.24 90 top
NOREF#139  -  []  15.88 47.18 0 top
NOREF#140  -  []  14.26 14.13 0 top
NOREF#141  -  []  10.01 18.79 0 top
NOREF#142  -  []  37.07 36.55 0 top
NOREF#143  -  []  25.69 31.64 90 top
NOREF#144  -  []  28.23 33.13 0 top
NOREF#145  -  []  43.8 17.44 0 top
NOREF#146  -  []  26.11 13.85 90 top
NOREF#147  -  []  51.05 66.29 90 top
NOREF#148  -  []  8.23 13.35 90 top
NOREF#149  -  []  11.48 31.49 0 top
NOREF#150  -  []  7.05 53.66 0 top
NOREF#151  -  []  39.36 5.26 90 top
NOREF#152  -  []  33 34.44 90 top
NOREF#153  -  []  34.54 34.83 90 top
NOREF#154  -  []  4.79 57.84 90 top
NOREF#155  -  []  31.79 14.05 90 top
NOREF#156  -  []  7.62 20.01 90 top
NOREF#157  -  []  31.69 26.72 0 top
NOREF#158  -  []  39.23 38.62 0 top
NOREF#159  -  []  13.28 53.27 0 top
NOREF#160  -  []  27.21 32.29 90 top
NOREF#161  -  []  15.01 6.53 90 top
NOREF#162  -  []  1.02 41.89 0 top
NOREF#163  -  []  42.95 32.67 0 top
NOREF#164  -  []  43.11 3.61 90 top
NOREF#165  -  []  36.7 53.46 0 top
NOREF#166  -  []  27.4 36.27 0 top
NOREF#167  -  []  14.96 32.05 90 top
NOREF#168  -  []  32.03 32.16 90 top
NOREF#169  -  []  28.64 34.69 0 top
NOREF#170  -  []  19.05 49.79 0 top
NOREF#171  -  []  22.61 15.8 90 top
NOREF#172  -  []  44.17 4.91 0 top
NOREF#173  -  []  22.99 39.16 90 top
NOREF#174  -  []  32.77 10.29 90 top
NOREF#175  -  []  28.91 63.42 90 top
NOREF#176  -  []  39.3 50.88 90 top
NOREF#177  -  []  17.37 13.88 90 top
NOREF#178  -  []  4.79 44.78 0 top
NOREF#179  -  []  19.12 31.76 90 top
NOREF#180  -  []  27.76 33.89 90 top
NOREF#181  -  []  31.7 58.21 90 top
NOREF#182  -  []  42.62 42.74 90 top
NOREF#183  -  []  22.69 38.14 0 top
NOREF#184  -  []  32.39 15.31 90 top
NOREF#185  -  []  14.65 53.7 0 top
NOREF#186  -  []  46.18 11.75 0 top
NOREF#187  -  []  28.69 12.65 90 top
NOREF#188  -  []  44.57 3.06 90 top
NOREF#189  -  []  34.13 11.33 90 top
NOREF#190  -  []  10.94 35.55 0 top
NOREF#191  -  []  17.59 6.09 90 top
NOREF#192  -  []  38.28 23.04 90 top
NOREF#193  -  []  10.56 43.93 90 top
NOREF#194  -  []  33.16 33.88 0 top
NOREF#195  -  []  45.25 33.7 0 top
NOREF#196  -  []  21.23 3.28 0 top
NOREF#197  -  []  19.65 49.79 90 top
NOREF#198  -  []  41.81 20.67 90 top
NOREF#199  -  []  42.05 33.1 0 top
NOREF#200  -  []  35.06 50.63 0 top
NOREF#201  -  []  44.05 4.84 90 top
NOREF#202  -  []  45.02 3.61 90 top
NOREF#203  -  []  31.92 15.17 0 top
NOREF#204  -  []  45.12 21.66 0 top
NOREF#205  -  []  24.72 38.48 90 top
NOREF#206  -  []  47.17 13.41 90 top
NOREF#207  -  []  29.65 29.62 0 top
NOREF#208  -  []  18.58 36.25 90 top
NOREF#209  -  []  46.33 33.24 0 top
NOREF#210  -  []  30.53 32.41 90 top
NOREF#211  -  []  29.37 36.58 0 top
NOREF#212  -  []  43.4 47.66 90 top
NOREF#213  -  []  47.38 4.06 0 top
NOREF#214  -  []  34.16 13.43 90 top
NOREF#215  -  []  4.23 62.9 0 top
NOREF#216  -  []  40.31 8.78 90 top
NOREF#217  -  []  22.18 4.67 0 top
NOREF#218  -  []  35.08 57.97 90 top
NOREF#219  -  []  13.09 30.7 90 top
NOREF#220  -  []  39.25 43.46 0 top
NOREF#221  -  []  43.31 64.37 0 top
NOREF#222  -  []  25.91 36.13 0 top
NOREF#223  -  []  27.86 29.22 0 top
NOREF#224  -  []  22.22 13.88 0 top
NOREF#225  -  []  45.77 17.59 90 top
NOREF#226  -  []  34.92 21.9 90 top
NOREF#227  -  []  28 36.27 90 top
NOREF#228  -  []  38.8 51.88 0 top
NOREF#229  -  []  38.46 42.74 90 top
NOREF#230  -  []  28.72 24.8 0 top
NOREF#231  -  []  44.21 23.17 0 top
NOREF#232  -  []  34.44 30.7 90 top
NOREF#233  -  []  42.58 43.05 0 top
NOREF#234  -  []  49 58.49 90 top
NOREF#235  -  []  12.12 43.48 0 top
NOREF#236  -  []  36.78 10.44 90 top
NOREF#237  -  []  32.8 36.5 0 top
NOREF#238  -  []  15.34 50.09 0 top
NOREF#239  -  []  34.62 22.5 0 top
NOREF#240  -  []  9.51 19.01 90 top
NOREF#241  -  []  20.22 6.33 0 top
NOREF#242  -  []  46.12 20.64 90 top
NOREF#243  -  []  21.17 4.72 90 top
NOREF#244  -  []  27.48 15.29 90 top
NOREF#245  -  []  28.86 17.44 0 top
NOREF#246  -  []  41.22 9.92 90 top
NOREF#247  -  []  7.86 57.13 0 top
NOREF#248  -  []  44.36 62.79 90 top
NOREF#249  -  []  33.17 37.76 90 top
NOREF#250  -  []  3.43 61.47 90 top
NOREF#251  -  []  27.81 32.83 0 top
NOREF#252  -  []  13.34 20.21 0 top
NOREF#253  -  []  41.26 21.1 0 top
NOREF#254  -  []  36.76 49.73 0 top
NOREF#255  -  []  33.22 53.5 90 top
NOREF#256  -  []  34.18 20.39 90 top
NOREF#257  -  []  43.21 14.06 0 top
NOREF#258  -  []  8.44 63.73 90 top
NOREF#259  -  []  22.69 39.76 0 top
NOREF#260  -  []  14.61 52.88 0 top
NOREF#261  -  []  37.33 23.09 0 top
NOREF#262  -  []  7.05 6.63 90 top
NOREF#263  -  []  26.88 14.76 0 top
NOREF#264  -  []  7.29 21.37 90 top
NOREF#265  -  []  7.6 54.01 0 top
NOREF#266  -  []  11.83 32.37 0 top
NOREF#267  -  []  29.14 62.37 90 top
NOREF#268  -  []  45.52 4.01 0 top
NOREF#269  -  []  33.1 50.19 0 top
NOREF#270  -  []  47.01 56.99 90 top
NOREF#271  -  []  43.35 28.68 90 top
NOREF#272  -  []  39.25 31.3 90 top
NOREF#273  -  []  46.07 18.62 90 top
NOREF#274  -  []  12.77 36.04 0 top
NOREF#275  -  []  35.14 15.92 0 top
NOREF#276  -  []  12.98 39.45 90 top
NOREF#277  -  []  21.16 6.61 0 top
NOREF#278  -  []  30.38 31.4 0 top
NOREF#279  -  []  30.56 15.11 90 top
NOREF#280  -  []  43.71 44.63 0 top
NOREF#281  -  []  9.18 33.48 90 top
NOREF#282  -  []  21.16 6.29 90 top
NOREF#283  -  []  28.72 13.37 0 top
NOREF#284  -  []  37.29 42.87 90 top
NOREF#285  -  []  16.46 24.05 0 top
NOREF#286  -  []  11.38 50.09 90 top
NOREF#287  -  []  43.62 4.01 0 top
NOREF#288  -  []  29.85 18.44 90 top
NOREF#289  -  []  9.19 20.37 0 top
NOREF#290  -  []  37.81 11.53 90 top
NOREF#291  -  []  34.24 35.43 0 top
NOREF#292  -  []  9.12 49.79 0 top
NOREF#293  -  []  44.51 47.86 0 top
NOREF#294  -  []  4.79 58.74 0 top
NOREF#295  -  []  26.8 32.29 0 top
NOREF#296  -  []  39.14 50.61 90 top
NOREF#297  -  []  17.85 31.29 90 top
NOREF#298  -  []  22.99 39.72 90 top
NOREF#299  -  []  35.54 51.37 90 top
NOREF#300  -  []  28.29 38.06 90 top
NOREF#301  -  []  45.89 16.7 0 top
NOREF#302  -  []  37.77 38.26 0 top
NOREF#303  -  []  27.12 34.1 90 top
NOREF#304  -  []  30.37 63.04 0 top
NOREF#305  -  []  44.55 47.38 90 top
NOREF#306  -  []  7.05 35.89 90 top
NOREF#307  -  []  51.3 58.49 90 top
NOREF#308  -  []  41.81 10.01 90 top
NOREF#309  -  []  12.47 20.6 90 top
NOREF#310  -  []  30.38 32 90 top
NOREF#311  -  []  11.79 40.34 0 top
NOREF#312  -  []  44.31 23.64 90 top
NOREF#313  -  []  31.34 33.85 0 top
NOREF#314  -  []  1.61 50.28 0 top
NOREF#315  -  []  13.36 16.12 0 top
NOREF#316  -  []  32.82 50.97 0 top
NOREF#317  -  []  44.13 62.93 0 top
NOREF#318  -  []  35.4 11.89 90 top
NOREF#319  -  []  37.05 53.11 0 top
NOREF#320  -  []  46.26 40.46 90 top
NOREF#321  -  []  24.72 74.04 90 top
NOREF#322  -  []  44.6 33.25 0 top
NOREF#323  -  []  46.12 22.67 90 top
NOREF#324  -  []  30.11 35.75 90 top
NOREF#325  -  []  23.75 13.56 90 top
NOREF#326  -  []  33.92 35.31 90 top
NOREF#327  -  []  12.68 40.05 0 top
NOREF#328  -  []  33.32 35.82 0 top
NOREF#329  -  []  28.23 32.6 0 top
NOREF#330  -  []  30.49 3.68 90 top
NOREF#331  -  []  18.01 50.09 90 top
NOREF#332  -  []  34.54 15.92 90 top
NOREF#333  -  []  15.9 37.12 90 top
NOREF#334  -  []  51.3 59.19 0 top
NOREF#335  -  []  15.97 19.8 90 top
NOREF#336  -  []  7.1 4.77 0 top
NOREF#337  -  []  31.83 11.45 0 top
NOREF#338  -  []  33.58 20.39 0 top
NOREF#339  -  []  40.95 61.37 0 top
NOREF#340  -  []  38.12 53.12 0 top
NOREF#341  -  []  31.21 61.28 0 top
NOREF#342  -  []  1.61 49.14 90 top
NOREF#343  -  []  34.13 11.93 0 top
NOREF#344  -  []  45.62 46.92 90 top
NOREF#345  -  []  38.81 52.52 0 top
NOREF#346  -  []  23.88 62.25 90 top
NOREF#347  -  []  32.39 14.3 90 top
NOREF#348  -  []  46.19 16.1 90 top
NOREF#349  -  []  39.97 27.68 0 top
NOREF#350  -  []  35.06 51.14 90 top
NOREF#351  -  []  26.87 33.57 0 top
NOREF#352  -  []  47.01 56.99 0 top
NOREF#353  -  []  28.03 63.19 0 top
NOREF#354  -  []  43.23 17.43 90 top
NOREF#355  -  []  26.79 30.13 90 top
NOREF#356  -  []  37.23 30.91 0 top
NOREF#357  -  []  32.79 29.83 90 top
NOREF#358  -  []  29.64 34.16 0 top
NOREF#359  -  []  38.35 11.53 90 top
NOREF#360  -  []  7.87 21.97 0 top
NOREF#361  -  []  7.05 6.52 90 top
NOREF#362  -  []  44.97 4.84 90 top
NOREF#363  -  []  15.3 19.8 90 top
NOREF#364  -  []  34.13 49.99 0 top
NOREF#365  -  []  20.08 4.76 90 top
NOREF#366  -  []  36.14 51.37 0 top
NOREF#367  -  []  26.2 31.64 90 top
NOREF#368  -  []  45.46 27.46 0 top
NOREF#369  -  []  33.89 45.89 90 top
NOREF#370  -  []  31.32 15.17 90 top
NOREF#371  -  []  35.48 10.26 0 top
NOREF#372  -  []  16.22 36.1 90 top
NOREF#373  -  []  34.45 63.21 0 top
NOREF#374  -  []  29.1 20.23 0 top
NOREF#375  -  []  46.51 34.82 0 top
NOREF#376  -  []  35.74 11.04 0 top
NOREF#377  -  []  32.39 13.28 90 top
NOREF#378  -  []  33.68 49.91 0 top
NOREF#379  -  []  30.99 36.59 0 top
NOREF#380  -  []  20.99 4.79 0 top
NOREF#381  -  []  45.52 29.34 0 top
NOREF#382  -  []  15.57 14.13 0 top
NOREF#383  -  []  44.21 22.16 0 top
NOREF#384  -  []  46.52 29.34 90 top
NOREF#385  -  []  13.72 40.58 90 top
NOREF#386  -  []  9.11 18.79 0 top
NOREF#387  -  []  45.32 47.52 0 top
NOREF#388  -  []  32.99 13.28 0 top
NOREF#389  -  []  30.2 13.26 90 top
NOREF#390  -  []  37.81 10.46 90 top
NOREF#391  -  []  35 30.01 90 top
NOREF#392  -  []  31 31.78 90 top
NOREF#393  -  []  29.14 37.63 0 top
NOREF#394  -  []  34.18 21.03 90 top
NOREF#395  -  []  46.17 13.41 0 top
NOREF#396  -  []  32.06 31.42 0 top
NOREF#397  -  []  16.51 25.33 0 top
NOREF#398  -  []  15.62 6.52 90 top
NOREF#399  -  []  32.99 13.79 0 top
NOREF#400  -  []  41.81 20.07 0 top
NOREF#401  -  []  32.66 54.63 90 top
NOREF#402  -  []  37.84 16.12 0 top
NOREF#403  -  []  43.16 62.9 0 top
NOREF#404  -  []  32.46 57.65 0 top
NOREF#405  -  []  7.13 25.21 90 top
NOREF#406  -  []  32.2 67.21 90 top
NOREF#407  -  []  41.81 4.91 0 top
NOREF#408  -  []  45.47 4.06 0 top
NOREF#409  -  []  47.01 57.27 0 top
NOREF#410  -  []  39.45 4.93 0 top
NOREF#411  -  []  45.77 18.19 0 top
NOREF#412  -  []  12.09 31.7 0 top
NOREF#413  -  []  7.1 4.77 0 top
NOREF#414  -  []  10.6 32.45 0 top
NOREF#415  -  []  22.99 38.65 90 top
NOREF#416  -  []  17.63 25.22 0 top
NOREF#417  -  []  31.79 13.45 0 top
NOREF#418  -  []  14.76 28.44 90 top
NOREF#419  -  []  27.3 13.38 90 top
NOREF#420  -  []  12.54 32.65 90 top
NOREF#421  -  []  22.72 24.8 0 top
